# Altium PCB LST.PcbDoc (part 4 of 6)
Units mil, origin at the board's own origin, x right, y up, seen from the top; angles counter-clockwise.
Board outline 4330.71 x 4330.71 mil, 2 copper layers (Top Layer, Bottom Layer), stack 50 mil thick; 464 components, 242 nets, 1328 pads, 128 vias.
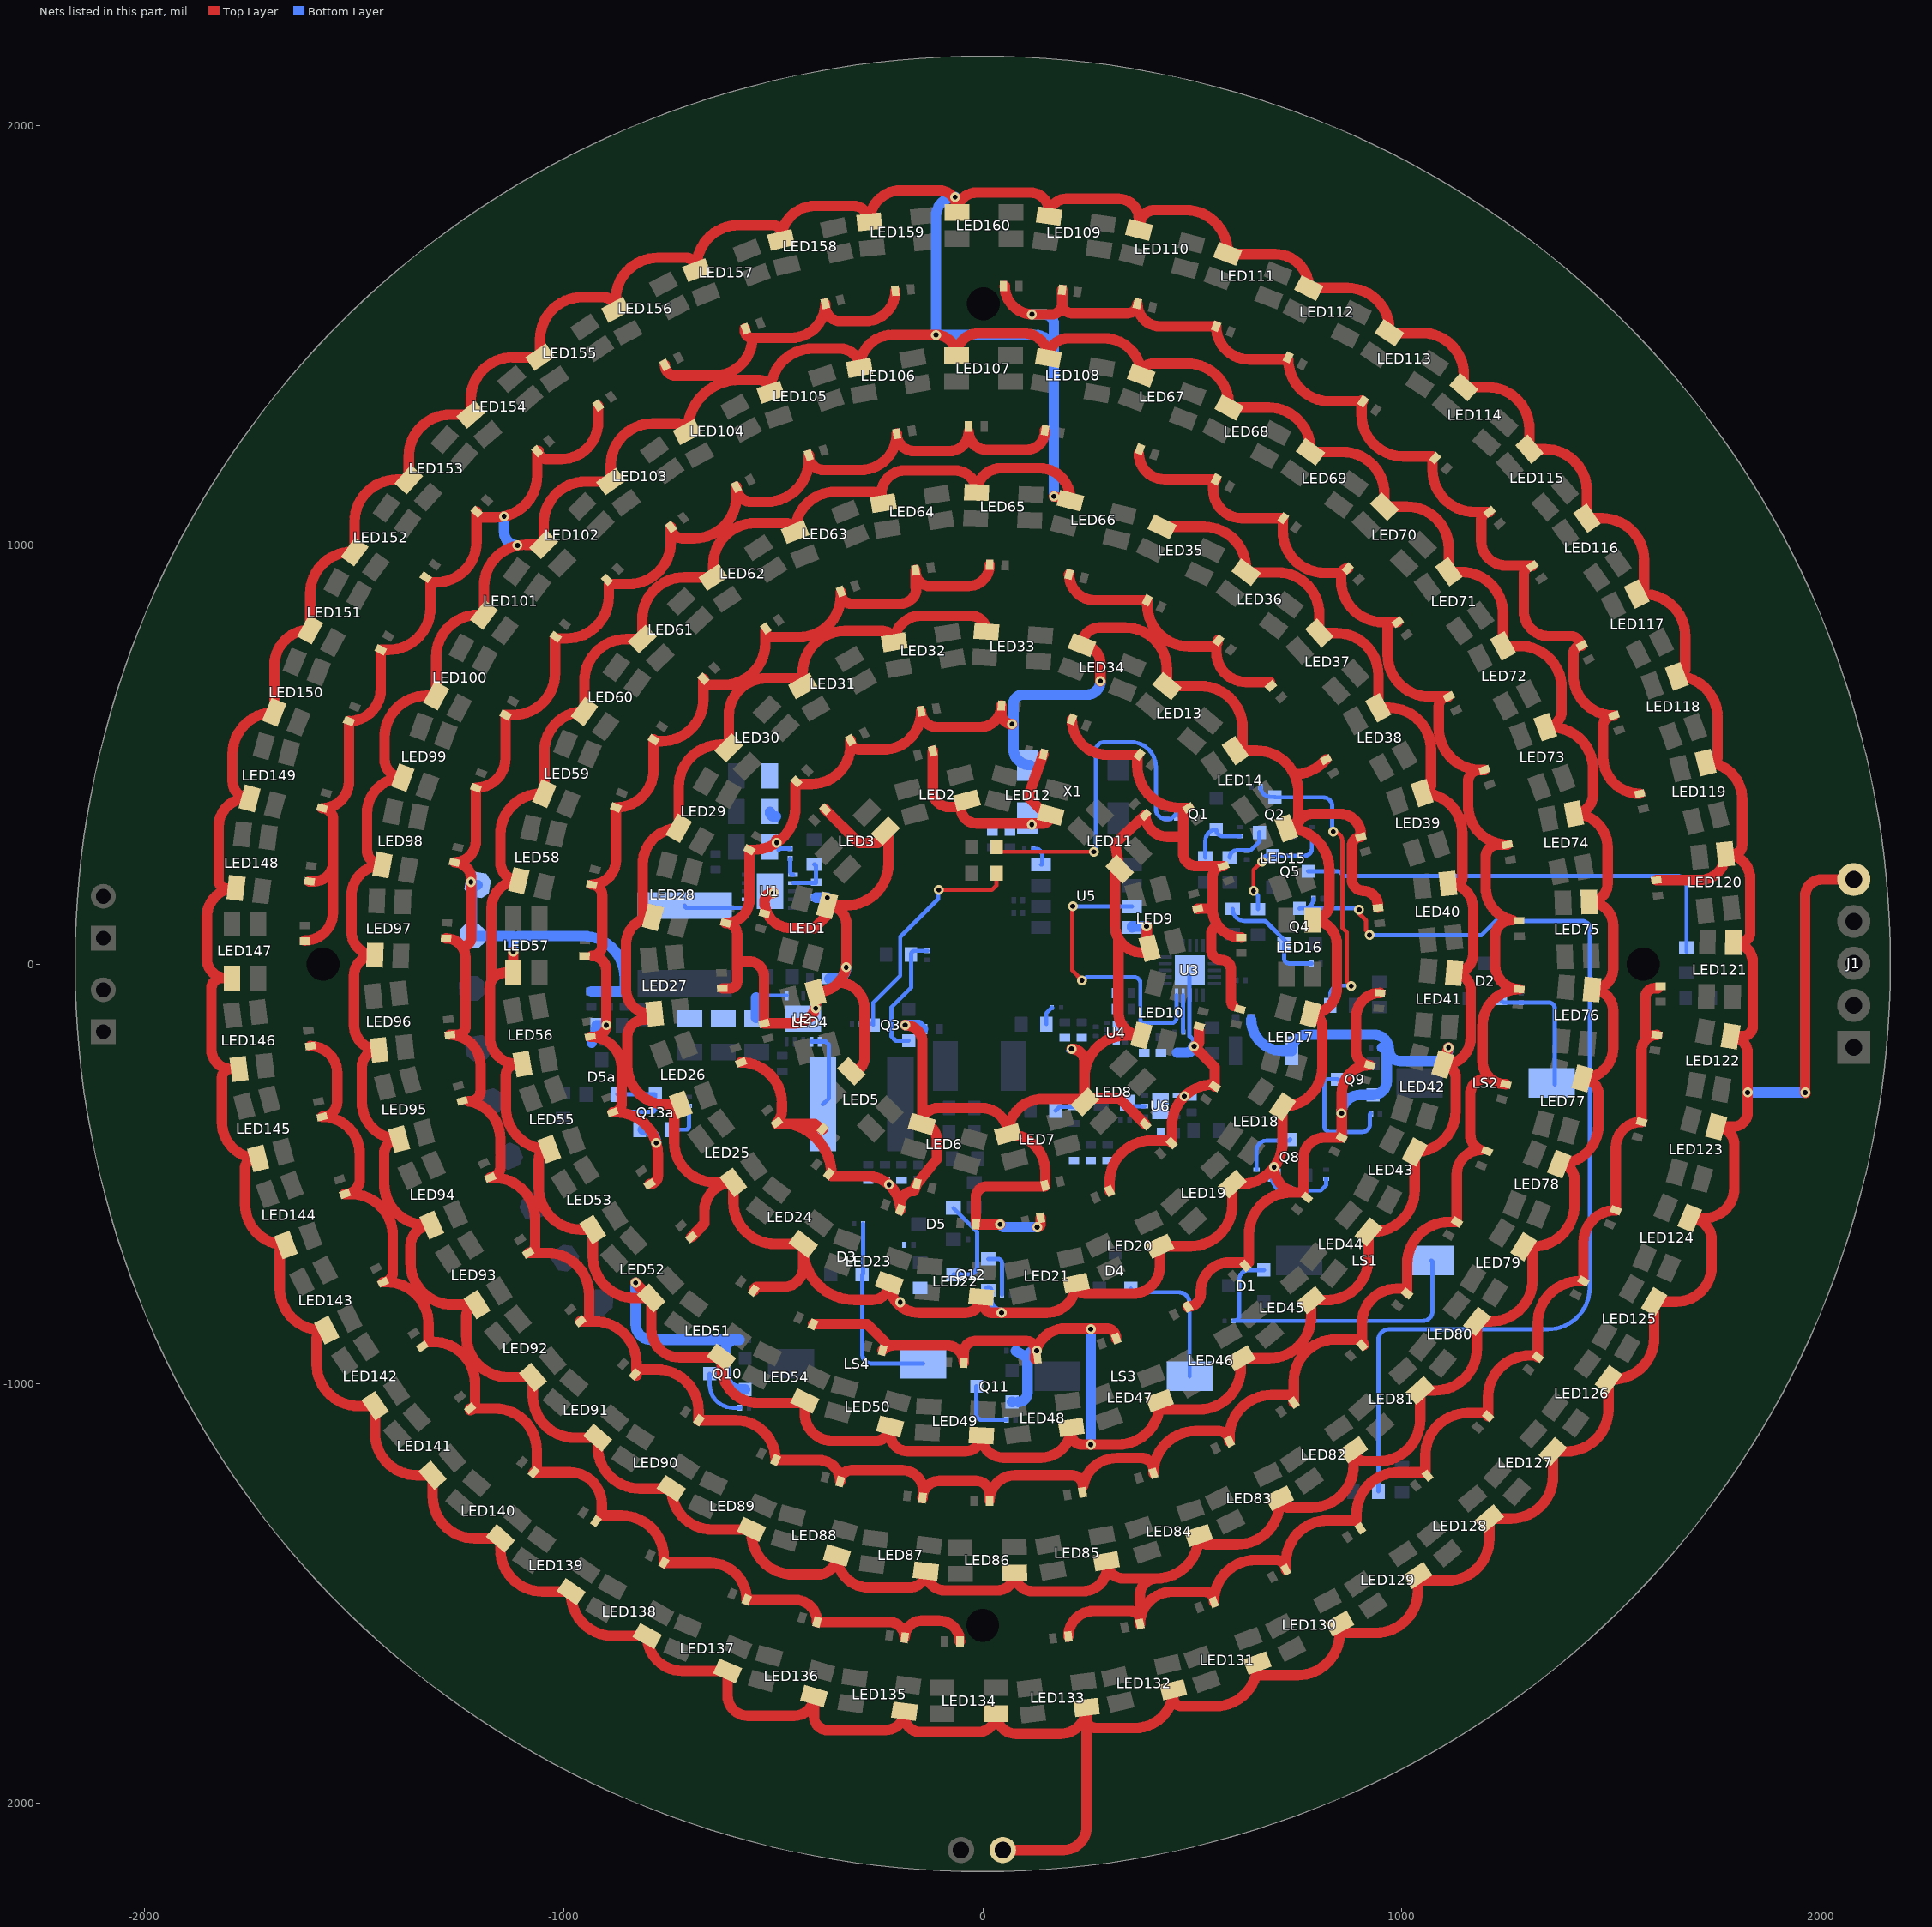
[diagram p3: the nets of this part, all layers, seen from the top]

## Via types
v1: diameter 23.62, hole 11.81, Top Layer to Bottom Layer, tented top, 98 vias
v2: diameter 23.62, hole 11.81, Top Layer to Bottom Layer, 30 vias

## Nets (pads, with @x,y where several pads share a name; then routed paths per layer and width w, separated by ;. In a path a pad name is that pad's centre, name@x,y a point inside that pad or via, vN(x,y) a via of type N, cw(c..) or ccw(c..) an arc to the next point about the centre after c; other vN are vias at no path point) (continued)
GND: C1.1 C2.1 C3.1 C4.1 C5.1 C6.1 C7.2 C8.2 C9.1 C10.1 C11.1 C12.1 C13.1 C14.2 C15.2 C16.2 C17.2 C18.2 C19.2 C20.2 C21.2 C22.2 C23.2 C24.2 C25.1 C26.1 C27.1 C28.1 C29.1 C30.1 C31.1 C32.1 C33.1 C34.1 C35.1 C36.1 C37.1 C38.1 C39.1 C40.1 C41.1 C42.1 C43.1 C44.1 C45.1 C46.1 C47.1 C48.1 C49.1 C50.1 C51.1 C52.1 C53.1 C54.1 C55.1 C56.1 C57.1 C58.1 C59.1 C60.1 C61.1 C62.1 C63.1 C64.1 C65.1 C66.1 C67.1 C68.1 C69.1 C70.1 C71.1 C72.1 C73.1 C74.1 C75.1 C76.1 C77.1 C78.1 C79.1 C80.1 C81.1 C82.1 C83.1 C84.1 C85.1 C86.1 C87.1 C88.1 C89.1 C90.1 C91.1 C92.1 C93.1 C94.1 C95.1 C96.1 C97.1 C98.1 C99.1 C100.1 C101.1 C102.1 C103.1 C104.1 C105.1 C106.1 C107.1 C108.1 C109.1 C110.1 C111.1 C112.1 C113.1 C114.1 C115.1 C116.1 C117.1 C118.1 C119.1 C120.1 C121.1 C122.1 C123.1 C124.1 C125.1 C126.1 C127.1 C128.1 C129.1 C130.1 C131.1 C132.1 C133.1 C134.1 C135.1 C136.1 C137.1 C138.1 C139.1 C140.1 C141.1 C142.1 C143.1 C144.1 C145.1 C146.1 C147.1 C148.1 C149.1 C150.1 C151.1 C152.1 C153.1 C154.1 C155.1 C156.1 C157.1 C158.1 C159.1 C160.1 C161.1 C162.1 C163.1 C164.1 C165.1 C166.1 C167.1 C168.1 C169.1 C170.1 C171.1 C172.1 C173.1 C174.1 C175.1 C176.1 C177.1 C178.1 C179.1 C180.1 C181.1 C182.1 C183.1 C184.1 C185.1 C186.1 C187.1 C188.1 C189.1 C191.1 C192a.1 J1.5 J2.2 LED1.3 LED2.3 LED3.3 LED4.3 LED5.3 LED6.3 LED7.3 LED8.3 LED9.3 LED10.3 LED11.3 LED12.3 LED13.3 LED14.3 LED15.3 LED16.3 LED17.3 LED18.3 LED19.3 LED20.3 LED21.3 LED22.3 LED23.3 LED24.3 LED25.3 LED26.3 LED27.3 LED28.3 LED29.3 LED30.3 LED31.3 LED32.3 LED33.3 LED34.3 LED35.3 LED36.3 LED37.3 LED38.3 LED39.3 LED40.3 LED41.3 LED42.3 LED43.3 LED44.3 LED45.3 LED46.3 LED47.3 LED48.3 LED49.3 LED50.3 LED51.3 LED52.3 LED53.3 LED54.3 LED55.3 LED56.3 LED57.3 LED58.3 LED59.3 LED60.3 LED61.3 LED62.3 LED63.3 LED64.3 LED65.3 LED66.3 LED67.3 LED68.3 LED69.3 LED70.3 LED71.3 LED72.3 LED73.3 LED74.3 LED75.3 LED76.3 LED77.3 LED78.3 LED79.3 LED80.3 LED81.3 LED82.3 LED83.3 LED84.3 LED85.3 LED86.3 LED87.3 LED88.3 LED89.3 LED90.3 LED91.3 LED92.3 LED93.3 LED94.3 LED95.3 LED96.3 LED97.3 LED98.3 LED99.3 LED100.3 LED101.3 LED102.3 LED103.3 LED104.3 LED105.3 LED106.3 LED107.3 LED108.3 LED109.3 LED110.3 LED111.3 LED112.3 LED113.3 LED114.3 LED115.3 LED116.3 LED117.3 LED118.3 LED119.3 LED120.3 LED121.3 LED122.3 LED123.3 LED124.3 LED125.3 LED126.3 LED127.3 LED128.3 LED129.3 LED130.3 LED131.3 LED132.3 LED133.3 LED134.3 LED135.3 LED136.3 LED137.3 LED138.3 LED139.3 LED140.3 LED141.3 LED142.3 LED143.3 LED144.3 LED145.3 LED146.3 LED147.3 LED148.3 LED149.3 LED150.3 LED151.3 LED152.3 LED153.3 LED154.3 LED155.3 LED156.3 LED157.3 LED158.3 LED159.3 LED160.3 P7.1 P9.1 Q8.2 Q9.2 Q10.2 Q11.2 Q12.2 Q13a.2 R14.2 R16.2 R24.2 R25.2 R26.2 R27.2 R34.1 R35a.1 SW1.2 U1.11 U2.11 U3.3 U3.21 U4.5 U4.9 U5.4 U6.1 U6.7 X1.2 X1.3 | length 83669.4
  Top Layer w10: C85.1@-936,-172.61 C85.1@-925.61,-172.61
  Top Layer w25: -1803,180.39 cw(c-1803,200.39) -1823,200.39 -1823,328.39 cw(c-1755.32,328.39) -1755.32,396.07 LED149.3@-1748.75,396.07 cw(c-1748.75,437.06) -1789.74,437.06 -1789.74,501.46 cw(c-1690.02,501.46) LED150.3@-1690.02,601.18 -1690.02,712.48 cw(c-1604.51,712.48) LED151.3@-1604.51,798 -1604.51,883.95 cw(c-1504.51,883.95) -1504.51,983.95 LED152.3@-1498.32,983.95 -1498.32,1056.22 cw(c-1398.32,1056.22) -1398.32,1156.22 LED153.3@-1369.32,1156.22 -1369.32,1211.5 cw(c-1269.32,1211.5) -1269.32,1311.5 LED154.3@-1221.13,1311.5 -1221.13,1348.07 cw(c-1121.13,1348.07) -1121.13,1448.07 LED155.3@-1055.92,1448.07 -1055.92,1491.39 cw(c-955.92,1491.39) -955.92,1591.39 -905.46,1591.39 cw(c-905.46,1561.54) LED156.3@-875.61,1561.54 -875.61,1585.39 cw(c-775.61,1585.39) -775.61,1685.39 -708.1,1685.39 cw(c-708.1,1659.71) LED157.3@-682.42,1659.71 ; LED147.3@-1791.1,-32.67 LED147.3@-1805.06,-32.67 ; LED148.3@-1781.74,182.09 ccw(c-1781.74,112.83) -1851,112.83 -1851,13.28 ccw(c-1805.06,13.28) LED147.3@-1805.06,-32.67 ; C177.1@-1617,56.87 ccw(c-1617,123.87) -1550,123.87 -1550,242.39 ; C178.1@-1606.25,198.03 -1594.36,198.03 ccw(c-1594.36,242.39) -1550,242.39 ; C176.1@-1604,-194.97 cw(c-1604,-258.97) -1540,-258.97 -1540,-327.8 cw(c-1575.84,-327.8) C175.1@-1575.84,-363.64 cw(c-1575.84,-453.47) -1486,-453.47 -1486,-512.32 cw(c-1521.67,-512.32) C174.1@-1521.67,-547.99 -1507.21,-547.99 cw(c-1507.21,-647.99) -1407.21,-647.99 -1407.21,-734.7 cw(c-1430.6,-734.7) C173.1@-1430.6,-758.09 -1422.03,-758.09 cw(c-1422.03,-858.09) -1322.03,-858.09 -1322.03,-900.58 -1311,-900.58 cw(c-1311,-1000.58) -1211,-1000.58 -1211,-1051.26 cw(c-1222.86,-1051.26) C171.1@-1214.38,-1059.56 ; LED143.3@-1565.4,-872.58 LED143.3@-1569.97,-872.58 ; C126.1@-1279.97,61.91 cw(c-1279.97,15.95) -1242.29,42.28 ; C171.1@-1222.86,-1063.13 ccw(c-1222.86,-1051.26) C171.1@-1214.38,-1059.56 ; C171.1@-1222.86,-1059.56 C171.1@-1214.38,-1059.56 ; C183.1@-1207.38,1079.64 -1207.38,1008.56 cw(c-1305,1008.56) -1305,910.94 -1317.59,910.94 -1317.59,850.21 cw(c-1417.59,850.21) -1417.59,750.21 C181.1@-1435.97,750.21 -1435.97,656.2 cw(c-1511.93,656.2) C180.1@-1511.93,580.24 -1511.93,436.38 cw(c-1575.79,436.38) C179.1@-1575.79,372.52 cw(c-1575.79,346.73) -1550,346.73 -1550,242.39 ; -1198.18,1066.39 -1162.96,1066.39 ccw(c-1162.96,1166.39) v1@-1142,1068.61 ; -1172,-35.61 -1172,134.3 cw(c-1106.83,134.3) LED58.3@-1106.83,199.47 cw(c-1106.83,243.19) -1150.54,243.19 -1150.54,310.27 cw(c-1053.7,310.27) -1053.7,407.11 LED59.3@-1045.86,407.11 -1045.86,507.69 cw(c-950.11,507.69) LED60.3@-950.11,603.44 -950.11,675.91 cw(c-850.11,675.91) -850.11,775.91 LED61.3@-812.05,775.91 -812.05,823.31 cw(c-712.05,823.31) -712.05,923.31 LED62.3@-643.09,923.31 -643.09,952.39 cw(c-543.09,952.39) -543.09,1052.39 -468.87,1052.39 cw(c-468.87,1031.04) LED63.3@-447.52,1031.04 cw(c-351.17,1031.04) -351.17,1127.39 -264.34,1127.39 cw(c-264.34,1100.01) LED64.3@-236.95,1100.01 ; v1@-1142,1068.65 v1(-1141.84,1068.65) ccw(c-1162.96,1166.39) -1062.96,1166.39 C184.1@-1062.96,1224.25 ; v1(-1120,30.39) LED57.3@-1120.1,-20.18 -1140.57,-20.18 ccw(c-1140.57,-55.61) -1176,-55.61 -1176,-172.61 ccw(c-1111,-172.61) -1111,-237.61 ccw(c-1111,-264.61) -1138,-264.61 -1138,-340.92 ccw(c-1038,-340.92) -1038,-440.92 LED55.3@-1034.14,-440.92 ccw(c-1034.14,-465.94) -1059.16,-465.94 -1059.16,-532.85 ccw(c-959.16,-532.85) -959.16,-632.85 LED53.3@-930.3,-632.85 -930.3,-696.04 ccw(c-830.3,-696.04) -830.3,-796.04 LED52.3@-794.24,-796.04 ; C170.1@-1071.04,-1211.75 C170.1@-1067.47,-1211.75 ; C184.1@-1060.18,1225.25 ccw(c-1040.32,1225.25) -1040.32,1205.39 -1006,1205.39 ccw(c-1006,1293.78) -917.61,1293.78 C185.1@-917.61,1333.04 ; LED102.3@-1054.62,1001.08 -1089.7,1001.08 ccw(c-1089.7,901.08) -1189.7,901.08 LED101.3@-1189.7,833.54 -1203.77,833.54 ccw(c-1203.77,733.54) -1303.77,733.54 LED100.3@-1303.77,640.98 -1327,640.98 ccw(c-1327,540.98) -1427,540.98 -1427,489.04 ccw(c-1383.31,489.04) LED99.3@-1383.31,445.35 ccw(c-1383.31,359.66) -1469,359.66 -1469,274.09 ccw(c-1431.85,274.09) LED98.3@-1431.85,236.94 ccw(c-1431.85,162.79) -1506,162.79 -1506,78.13 ccw(c-1449.98,78.13) LED97.3@-1449.98,22.12 ccw(c-1449.98,-27.9) -1500,-27.9 -1500,-144.26 ccw(c-1440.18,-144.26) LED96.3@-1440.18,-204.07 ccw(c-1440.18,-244.89) -1481,-244.89 -1481,-328.36 ccw(c-1392.33,-328.36) LED95.3@-1392.33,-417.03 ccw(c-1392.33,-452.7) -1428,-452.7 -1428,-521.88 ccw(c-1328,-521.88) -1328,-621.88 LED94.3@-1314.3,-621.88 ccw(c-1314.3,-672.58) -1365,-672.58 -1365,-711.85 ccw(c-1265,-711.85) -1265,-811.85 LED93.3@-1206.16,-811.85 ccw(c-1206.16,-837.69) -1232,-837.69 -1232,-884.96 ccw(c-1132,-884.96) -1132,-984.96 LED92.3@-1073.32,-984.96 -1073.32,-1029.33 ccw(c-973.32,-1029.33) -973.32,-1129.33 LED91.3@-918.54,-1129.33 -918.54,-1150.44 ccw(c-818.54,-1150.44) -818.54,-1250.44 LED90.3@-742.79,-1250.44 ccw(c-645.14,-1250.44) -645.14,-1348.09 LED89.3@-551.63,-1348.09 -551.63,-1355.61 ccw(c-451.63,-1355.61) -451.63,-1455.61 -393.85,-1455.61 ccw(c-393.85,-1409.93) LED88.3@-348.18,-1409.93 ccw(c-271.5,-1409.93) -271.5,-1486.61 -174.96,-1486.61 ccw(c-174.96,-1447.35) LED87.3@-135.7,-1447.35 ccw(c-89.44,-1447.35) -89.44,-1493.61 34.07,-1493.61 ccw(c34.07,-1451.58) LED86.3@76.1,-1451.58 ccw(c120.13,-1451.58) 120.13,-1495.61 238.07,-1495.61 ccw(c238.07,-1436.58) 297.1,-1436.58 ccw(c336,-1423.61) 336,-1464.61 415.02,-1464.61 ; LED102.3@-1047.31,1001.08 -1047.31,1051.6 cw(c-947.31,1051.6) -947.31,1151.6 LED103.3@-887.52,1151.6 -887.52,1190.3 cw(c-787.52,1190.3) -787.52,1290.3 -725.37,1290.3 cw(c-725.37,1269.54) LED104.3@-704.61,1269.54 cw(c-579.76,1269.54) -579.76,1394.39 -535.41,1394.39 cw(c-535.41,1364.79) LED105.3@-505.81,1364.79 -505.81,1368.71 cw(c-405.81,1368.71) -405.81,1468.71 -339.89,1468.71 cw(c-339.89,1422.81) LED106.3@-293.99,1422.81 cw(c-215.4,1422.81) -215.4,1501.39 v1(-111.46,1501.39) cw(c-111.46,1452.49) LED107.3@-62.57,1452.49 cw(c-9.67,1452.49) -9.67,1505.39 97.66,1505.39 cw(c97.66,1446.23) LED108.3@156.81,1446.23 cw(c203.97,1446.23) 203.97,1493.39 289.27,1493.39 cw(c289.27,1404.7) LED67.3@377.96,1404.7 cw(c406.65,1404.7) 406.65,1433.39 487.59,1433.39 cw(c487.59,1333.39) 587.59,1333.39 LED68.3@587.59,1328.16 682.05,1328.16 cw(c682.05,1228.16) 782.05,1228.16 LED69.3@782.05,1222.5 858.34,1222.5 cw(c858.34,1122.5) 958.34,1122.5 LED70.3@958.34,1099.35 ; C130.1@-1020.13,775.95 -1020.13,695.06 cw(c-1120.13,695.06) -1120.13,595.06 C129.1@-1138.69,595.06 -1138.69,491.7 cw(c-1209,491.7) C128.1@-1209,421.39 -1209,294.53 cw(c-1260.16,294.53) C127.1@-1260.16,243.36 cw(c-1260.16,203.2) -1220,203.2 -1220,64.57 cw(c-1242.29,64.57) -1242.29,42.28 ; C130.1@-1020.13,777.61 -992.16,777.61 ccw(c-992.16,877.61) -892.16,877.61 -892.16,907.39 -843.97,907.39 ccw(c-843.97,1007.39) -743.97,1007.39 C132.1@-743.97,1043.52 ccw(c-716.84,1043.52) -716.84,1016.39 -687.48,1016.39 ccw(c-687.48,1116.39) -587.48,1116.39 C133.1@-587.48,1138.99 ccw(c-551.88,1138.99) -551.88,1103.39 -514.93,1103.39 ccw(c-514.93,1203.39) -414.93,1203.39 C134.1@-414.93,1214.27 ; C121.1@-960,-851.61 -926.04,-851.61 cw(c-926.04,-951.61) -826.04,-951.61 C120.1@-826.04,-980.75 ; -939,-838.61 -939,-788.2 ccw(c-1039,-788.2) -1039,-688.2 C122.1@-1084.2,-688.2 ccw(c-1084.2,-672) -1068,-672 -1068,-608.62 ccw(c-1168,-608.62) -1168,-508.62 -1174.65,-508.62 ccw(c-1174.65,-484.97) -1151,-484.97 -1151,-415.83 ccw(c-1241.35,-415.83) -1225.87,-326.82 -1223.21,-326.82 ccw(c-1223.21,-301.61) -1198,-301.61 -1198,-241.11 ccw(c-1271.07,-241.11) C125.1@-1271.07,-168.04 -1253.43,-168.04 ccw(c-1253.43,-148.61) -1234,-148.61 -1234,15.95 ccw(c-1279.97,15.95) -1242.29,42.28 ; C85.1@-936,-172.61 cw(c-936,-247.61) -861,-247.61 -861,-331.32 cw(c-882.67,-331.32) C84.1@-882.67,-352.99 -875,-352.99 cw(c-875,-452.99) -775,-452.99 -775,-504.32 cw(c-795,-504.32) C83.1@-795,-524.32 ; C85.1@-925.61,-172.61 ccw(c-925.61,-145) v2(-898,-145) -898,-14.49 ccw(c-932.44,-14.49) -932.44,19.95 ccw(c-932.44,44.39) -908,44.39 -908,165.39 ccw(c-933,165.39) C87.1@-933,190.39 ccw(c-933,248.16) -875.23,248.16 C88.1@-875.23,374.36 ccw(c-875.23,464.51) -785.08,464.51 C89.1@-785.08,532.36 ; v1(-828,-759.61) LED52.3@-794.24,-796.04 ; -818,-966.74 -777,-966.74 cw(c-777,-1066.26) -677.48,-1066.26 C119.1@-677.48,-1087.69 -588.98,-1087.69 cw(c-588.98,-1182.43) C118.1@-494.23,-1182.43 -391.5,-1182.43 cw(c-391.5,-1233.71) C117.1@-340.22,-1233.71 cw(c-313.12,-1233.71) -313.12,-1206.61 -192.71,-1206.61 cw(c-192.71,-1257.88) -141.44,-1257.88 ; C89.1@-785.08,536.27 C89.1@-785.08,532.36 ; C186.1@-758.33,1429.7 ccw(c-733.33,1429.7) -733.33,1404.7 -639.18,1404.7 ccw(c-639.18,1494.39) -549.49,1494.39 ; C82.1@-695,-650.61 -664,-617.85 -664,-588.91 cw(c-594.98,-588.91) LED25.3@-594.98,-519.89 ; LED157.3@-682.42,1656.29 LED157.3@-682.42,1659.71 ; C90.1@-666.31,681.37 C90.1@-666.31,670.16 ; LED51.3@-623.15,-937.31 LED51.3@-623.15,-937.61 ; C56.1@-621.03,-57.09 -602.19,-57.09 ccw(c-602.19,-40.61) -585.72,-40.61 -585.72,7.39 ; LED30.3@-605.65,516.73 LED30.3@-605.65,524.04 ; C55.1@-576.37,-233.88 cw(c-576.37,-331.25) -479,-331.25 -479,-348.74 cw(c-519.51,-348.74) C54.1@-490.87,-377.39 ; C187.1@-567.32,1516.76 -567.32,1512.22 ccw(c-549.49,1512.22) -549.49,1494.39 ; C58.1@-556.5,270.72 -556.5,154.89 cw(c-613,154.89) C57.1@-613,98.39 cw(c-613,71.11) -585.72,71.11 -585.72,7.39 ; C58.1@-556.5,273.35 -547.08,273.35 ccw(c-547.08,373.35) -447.08,373.35 -447.08,430.31 -408.42,430.31 ccw(c-408.42,523.24) -315.48,523.24 C60.1@-315.48,534.99 ccw(c-292.88,534.99) -292.88,512.39 -237.46,512.39 ccw(c-237.46,602.78) -170.79,541.75 ccw(c-237.46,602.78) -147.07,602.78 C61.1@-147.07,604.18 ccw(c-108.59,604.18) -108.59,565.7 -7.11,565.7 ccw(c-7.11,617.36) C62.1@44.55,617.36 44.55,598.62 ccw(c70,598.62) v1(70,573.17) ; C81.1@-545.78,-778.22 cw(c-537.16,-778.22) -537.16,-769.61 -476,-769.61 ccw(c-476,-721.88) -428.27,-721.88 LED24.3@-428.27,-677.96 ; v1(-499,170.39) -499,171.39 ccw(c-499,149.84) -520.55,149.84 ccw(c-457.1,149.84) -512.49,118.89 ccw(c-457.1,149.84) -457.1,86.39 -402,86.39 -371.25,117.14 LED1.3@-371.25,140.71 ; v1@-493,296.39 -493,291.66 ccw(c-491.53,291.66) v1(-491.53,290.19) ; C54.1@-490.87,-379.05 -490.87,-381 -457.74,-381 ; C134.1@-414.93,1214.67 ccw(c-379.64,1214.67) -379.64,1179.39 -292.01,1179.39 ccw(c-292.01,1266.18) C135.1@-205.22,1266.18 ccw(c-163.29,1266.18) -163.29,1224.25 -80,1224.25 ccw(c-80,1270.75) -33.5,1270.75 ccw(c9.75,1270.75) 9.75,1227.5 104,1227.5 ccw(c104,1272.07) 141.84,1248.53 ccw(c104,1272.07) 148.56,1272.07 C137.1@148.56,1273.96 ; C80.1@-405.23,-858.43 -275.57,-858.43 -226.17,-907.83 ; C34.1@-382.17,-394.06 -382.64,-393.73 -401,-381 -457.74,-381 ; C31.1@-375.92,369.72 -295.59,289.39 -250,289.39 LED3.3@-225.04,314.35 ; C92.1@-338.54,889.13 C92.1@-338.54,884.93 ; LED5.3@-313.66,-255.27 ccw(c-313.66,-223.61) -282,-223.61 -282,-105.54 ccw(c-344.3,-105.54) -344.3,-43.24 ; LED5.3@-313.66,-247.96 LED5.3@-313.66,-244.61 ; -242,1121.39 cw(c-185,1121.39) -185,1178.39 -67.11,1178.39 cw(c-67.11,1125.73) LED65.3@-14.44,1125.73 cw(c43.22,1125.73) 43.22,1183.39 136,1183.39 cw(c136,1110.51) 208.88,1110.51 LED66.3@208.88,1106.19 v1(170,1116.39) ; C79.1@-239.13,-920.79 cw(c-209.73,-950.19) -209.73,-908.61 -86.99,-908.61 cw(c-86.99,-950.55) C78.1@-45.05,-950.55 -45.05,-925.66 cw(c-18,-925.66) -18,-898.61 104,-898.61 cw(c104,-920.61) v1@126,-920.61 ; LED50.3@-232.8,-1102.36 LED50.3@-232.8,-1098.52 ; LED3.3@-225.04,318.05 LED3.3@-225.04,314.35 ; v2@-223.51,-525.61 v2(-223.51,-525.68) ; C189.1@-208.4,1606.46 cw(c-280.46,1606.46) -280.46,1534.39 -340,1534.39 cw(c-340,1569.99) -375.6,1569.99 C188.1@-375.6,1575.91 cw(c-457.12,1575.91) -457.12,1494.39 -549.49,1494.39 ; v2(-185,-144.61) cw(c-185,-185.67) -143.94,-185.67 LED6.3@-143.94,-370.91 ; C93.1@-160.31,940.5 C93.1@-160.31,936.7 ; C116.1@-143.64,-1272.87 cw(c-102.77,-1272.87) -102.77,-1232 -16.49,-1232 cw(c-16.49,-1265) 16.51,-1265 ; C30.1@-119.13,509.18 -119.13,413.52 ccw(c-81,413.52) -81,375.39 -53.2,375.39 ccw(c-13.7,375.39) -13.7,335.88 141.56,335.88 ccw(c141.56,356.64) LED12.3@162.32,356.64 150.75,356.64 108,399.39 C41.1@145,501.39 ; LED160.3@-61.57,1793.49 cw(c-13.67,1793.49) -13.67,1841.39 112.44,1841.39 cw(c112.44,1795.44) 158.39,1795.44 LED109.3@158.39,1785.18 cw(c199.6,1785.18) 199.6,1826.39 324,1826.39 cw(c324,1777.91) 372.48,1777.91 LED110.3@372.48,1752.19 ; LED160.3@-61.57,1803.96 ccw(c-104,1803.96) -104,1846.39 -195.15,1846.39 ccw(c-195.15,1771.07) LED159.3@-270.46,1771.07 ccw(c-308.78,1771.07) -308.78,1809.39 -399.69,1809.39 ccw(c-399.69,1728.17) LED158.3@-480.91,1728.17 -480.91,1744.3 ccw(c-500,1744.3) -500,1763.39 -582.42,1763.39 ccw(c-582.42,1663.39) -682.42,1663.39 LED157.3@-682.42,1659.71 ; C164.1@-54.5,-1615.61 ccw(c-104.5,-1615.61) -56.87,-1600.4 ccw(c-104.5,-1615.61) -104.5,-1565.61 -145.69,-1565.61 ccw(c-145.69,-1606.19) C165.1@-186.26,-1606.19 ccw(c-223.74,-1606.19) -223.74,-1568.71 C166.1@-395.22,-1568.71 ccw(c-448.09,-1568.71) -448.09,-1515.84 C167.1@-562.97,-1515.84 ccw(c-651.23,-1515.84) -651.23,-1427.58 C168.1@-760.82,-1427.58 -760.82,-1415.11 ccw(c-860.82,-1415.11) -860.82,-1315.11 -909,-1315.11 -909,-1287.61 ccw(c-984.86,-1287.61) -984.86,-1211.75 C170.1@-1067.47,-1211.75 ; LED22.3@-3.39,-793.22 cw(c-41.17,-793.22) -41.17,-831 -151.88,-831 cw(c-151.88,-759.92) LED23.3@-222.96,-759.92 cw(c-263.65,-759.92) -263.65,-800.61 -305.62,-800.61 cw(c-305.62,-677.96) LED24.3@-428.27,-677.96 ; 4,-813.99 ccw(c21.01,-813.99) 21.01,-831 v2(45,-831) 152.23,-831 ccw(c152.23,-760.61) LED21.3@222.62,-760.61 ccw(c247.62,-760.61) 247.62,-785.61 356.52,-785.61 ccw(c356.52,-719.47) 422.66,-719.47 LED20.3@422.66,-672.51 495.43,-672.51 ccw(c495.43,-572.51) 595.43,-572.51 LED19.3@595.43,-524.32 615,-524.32 ccw(c615,-424.32) v1@695,-484.32 ; LED33.3@8.76,793.92 ccw(c-28.98,793.92) -28.98,831.66 -147.13,831.66 ccw(c-147.13,767.81) LED32.3@-210.99,767.81 ccw(c-238.28,767.81) -238.28,795.1 -329.47,795.1 ccw(c-329.47,695.1) -429.47,695.1 LED31.3@-429.47,664.04 ccw(c-447.82,664.04) -447.82,682.39 -516,682.39 ccw(c-516,592.74) -605.65,592.74 LED30.3@-605.65,524.04 ; C115.1@16.5,-1279.61 cw(c77.37,-1279.61) 77.37,-1218.74 212.84,-1218.74 cw(c212.84,-1245.34) 239.44,-1245.34 cw(c320.01,-1259.4) 320.01,-1177.61 378.25,-1177.61 cw(c378.25,-1206.96) 407.59,-1206.96 C113.1@407.59,-1213.61 ; C94.1@16.51,953.04 cw(c-34.13,953.04) -34.13,902.39 -126,902.39 cw(c-126,936.7) C93.1@-160.31,936.7 ; v1(41.61,-620.22) C51.1@-16.57,-620.22 -16.57,-557.18 cw(c11,-557.18) 11,-529.61 146.92,-529.61 ccw(c146.92,-527.4) C36.1@149.13,-527.4 149.13,-493.91 ccw(c60.17,-493.91) LED7.3@60.17,-404.95 ; J2.2@48,-2112.61 192.88,-2112.61 ccw(c192.88,-2057.61) 247.88,-2057.61 247.88,-1809.48 ccw(c240.53,-1809.48) 240.53,-1802.14 ; C138.1@52.5,1618.39 ccw(c120.5,1618.39) v1@120.5,1550.39 ; v1(117.5,1550.39) v1@120.5,1550.39 ; C77.1@124.95,-940.61 cw(c196.95,-940.61) 196.95,-868.61 294.71,-868.61 cw(c294.71,-892.28) C76.1@318.38,-892.28 ; v1(130.16,-627.02) ccw(c130.16,-619.09) 138.1,-619.09 C50.1@138.1,-604.76 ; C139.1@189.68,1608.96 189.68,1575.71 ; C163.1@204.36,-1603.36 cw(c265.11,-1603.36) 265.11,-1542.61 353,-1542.61 cw(c353,-1564.64) C162.1@375.03,-1564.64 ; C95.1@206.1,930.34 ccw(c267.94,930.34) 267.94,868.5 C64.1@392.37,868.5 392.37,858.39 ccw(c492.37,858.39) 492.37,758.39 546.3,758.39 ccw(c546.3,772.66) C65.1@557.45,763.76 ; v1(212,-201.61) cw(c212,-232.61) 243,-232.61 243,-269.36 ; C63.1@212.85,584.32 ccw(c296.89,584.32) 296.89,500.28 C42.1@368.83,500.28 ; LED8.3@244.35,-328.27 253.01,-319.61 325.84,-319.61 C37.1@387.92,-381.69 ; v1(281,675.39) 281,717.2 ccw(c236.79,717.2) LED34.3@236.79,761.41 cw(c278.76,761.41) 278.76,803.39 339.53,803.39 cw(c339.53,703.39) 439.53,703.39 LED13.3@439.53,663.72 520,663.72 cw(c520,563.72) 620,563.72 620,527.68 cw(c602.44,527.68) LED14.3@602.44,510.12 653,510.12 cw(c653,410.12) 743.1,453.51 ; C49.1@302.77,-540.79 302.77,-520.06 cw(c402.77,-520.06) 402.77,-420.06 C48.1@449.95,-420.06 ; LED11.3@315.66,223.74 315.66,92.97 ccw(c380.82,92.97) 323.74,61.55 ; LED11.3@326.66,226.74 316,288.39 C40.1@388,356.64 ccw(c440.25,356.64) 440.25,304.39 478.04,304.39 ; C42.1@370.74,500.28 C42.1@368.83,500.28 ; C96.1@372.37,1218.52 ccw(c433.81,1218.52) 433.81,1157.07 C97.1@556.67,1157.07 ccw(c556.67,1150.41) 550,1150.41 550,1132.39 ccw(c618.13,1132.39) 618.13,1064.26 C98.1@715.84,1064.26 ; LED110.3@375.5,1764.65 cw(c410.24,1764.65) 410.24,1799.39 483.87,1799.39 cw(c483.87,1699.39) 543.87,1779.39 cw(c483.87,1699.39) 583.87,1699.39 LED111.3@583.87,1694.56 697.06,1694.56 cw(c697.06,1613.44) LED112.3@778.18,1613.44 870.37,1613.44 cw(c870.37,1513.44) 970.37,1513.44 LED113.3@970.37,1506.28 1047.83,1506.28 cw(c1047.83,1406.28) 1147.83,1406.28 LED114.3@1147.83,1376.71 1204.11,1376.71 cw(c1204.11,1276.71) 1304.11,1276.71 LED115.3@1304.11,1229.05 1341.44,1229.05 cw(c1341.44,1129.05) 1441.44,1129.05 LED116.3@1441.44,1064.12 1478,1064.12 cw(c1478,964.12) 1578,964.12 1578,901.07 cw(c1560.37,901.07) LED117.3@1560.37,883.45 1576,883.45 cw(c1576,783.45) 1676,783.45 1676,705.39 cw(c1657.66,705.39) 1657.66,687.05 LED118.3@1655.83,687.05 cw(c1655.83,589.88) 1753,589.88 1753,494.39 cw(c1740.17,494.39) 1740.17,481.56 LED119.3@1724.56,481.56 cw(c1724.56,394.12) 1812,394.12 1812,284.39 cw(c1790.46,284.39) 1790.46,262.85 LED120.3@1772.18,262.85 ; LED9.3@380.82,27.82 cw(c380.82,92.97) 323.74,61.55 ; LED9.3@391.25,36.04 v1@391.25,90.64 ; C113.1@407.59,-1213.89 C113.1@407.59,-1213.61 ; LED47.3@422.31,-1040.75 LED47.3@422.31,-1043.5 ; LED35.3@427.6,1043.65 528.15,1043.65 cw(c528.15,943.65) 628.15,943.65 LED36.3@628.15,935.09 702.91,935.09 cw(c702.91,835.09) 802.91,835.09 LED37.3@802.91,790.18 843.9,790.18 cw(c843.9,690.18) 943.9,690.18 LED38.3@943.9,611.94 969.55,611.94 cw(c969.55,511.94) 1069.55,511.94 1069.55,429.33 cw(c1048.63,429.33) LED39.3@1048.63,408.41 cw(c1048.63,313.04) 1144,313.04 1144,206.39 cw(c1130.46,206.39) 1130.46,192.85 LED40.3@1110.18,192.85 cw(c1110.18,133.04) 1170,133.04 1170,24.39 cw(c1124.61,24.39) LED41.3@1124.61,-21 cw(c1124.61,-60.39) 1164,-60.39 1164,-175.61 cw(c1100.65,-175.61) 1100.65,-238.96 LED42.3@1097.62,-238.96 ; C48.1@451,-426.61 451,-386.46 cw(c551,-386.46) 482.23,-313.86 cw(c551,-386.46) C47.1@551,-286.46 ; C75.1@489,-816.61 ccw(c489,-785.61) 520,-785.61 520,-779.61 cw(c588.89,-779.61) 588.89,-710.72 632.17,-710.72 ; C39.1@513,132.39 513,132.89 548,132.89 ; C38.1@516.21,-156.61 516.21,-183.57 cw(c504.17,-183.57) v1(504.17,-195.61) 553.61,-245.05 C47.1@553.61,-291.46 ; C161.1@551.38,-1521.28 C161.1@551.38,-1520.61 ; C65.1@560.56,772.66 cw(c546.3,772.66) C65.1@557.45,763.76 ; 597.84,-99.47 cw(c614,-84.76) 592.15,-84.76 592.15,-11.76 ccw(c570,-11.76) 570,10.39 cw(c570,35.39) 545,35.39 545,72.21 cw(c562.88,72.21) 562.88,90.09 ; C45.1@617,63.89 cw(c617,132.89) 562.88,90.09 ; 635.26,-710.72 635.26,-644.46 cw(c735.26,-644.46) 735.26,-544.46 755.85,-544.46 ; LED131.3@655.18,-1685.1 ccw(c665.69,-1685.1) 665.69,-1695.61 751.61,-1695.61 ccw(c751.61,-1595.61) 851.61,-1595.61 LED130.3@851.61,-1572.76 ccw(c873.46,-1572.76) 873.46,-1594.61 938.13,-1594.61 ccw(c938.13,-1494.61) 1038.13,-1494.61 LED129.3@1038.13,-1470.17 ; LED131.3@655.18,-1669.61 cw(c555.18,-1669.61) 555.18,-1769.61 474,-1769.61 cw(c474,-1750.35) 454.74,-1750.35 LED132.3@454.74,-1730.83 cw(c363.96,-1730.83) 363.96,-1821.61 269,-1821.61 cw(c269,-1800.49) 247.88,-1800.49 LED133.3@247.88,-1772.61 cw(c184.88,-1772.61) 240.53,-1802.14 ; C66.1@685.23,667.87 685.23,673.39 628.36,673.39 cw(c628.36,744.3) 557.45,744.3 C65.1@557.45,763.76 ; v1(695,-483.61) ccw(c755.85,-483.61) v1@695,-484.32 ; C98.1@717.03,1064.26 C98.1@715.84,1064.26 ; LED15.3@724.14,324.7 ccw(c724.14,353.56) 753,353.56 753,410.12 ccw(c653,410.12) 743.1,453.51 ; C111.1@742.15,-1045.6 C111.1@742.15,-1035.84 ; C67.1@819.03,488.57 812.87,482.41 cw(c743.1,552.19) 743.1,453.51 ; C99.1@870.92,944.21 ccw(c870.92,928.29) 855,928.29 ; C143.1@903.66,1344.73 C143.1@903.66,1342.73 ; C143.1@907.08,1342.73 C143.1@903.66,1342.73 ; C110.1@909.06,-908.61 ccw(c895.06,-908.61) C110.1@905,-898.76 ; C69.1@943.07,134.79 943.07,139.68 ccw(c907.36,139.68) 907.36,175.39 cw(c907.36,201.75) 881,201.75 881,282.7 cw(c902.28,282.7) C68.1@902.28,303.98 902.28,308.8 ccw(c851.93,308.8) 851.93,359.15 786.83,359.15 ccw(c786.83,322.08) 749.76,322.08 cw(c727,224.7) 827,224.7 827,145.39 cw(c787,145.39) LED16.3@787,105.39 cw(c787,47.39) 845,47.39 845,-55.61 cw(c782,-55.61) LED17.3@782,-118.61 cw(c782,-146.61) 810,-146.61 810,-244.61 cw(c715,-244.61) LED18.3@715,-339.61 715,-424.32 cw(c615,-424.32) v1@695,-484.32 ; C70.1@948.22,-67.89 ccw(c948.22,-125.11) 891,-125.11 891,-207.41 ccw(c923.82,-207.41) C71.1@923.82,-240.23 ccw(c923.82,-307.36) 856.69,-307.36 C72.1@856.69,-413.28 814.75,-413.28 ccw(c814.75,-463.03) 765,-463.03 765,-544.46 755.85,-544.46 ; LED70.3@958.34,1092.04 1011.82,1092.04 cw(c1011.82,992.04) 1111.82,992.04 LED71.3@1111.82,936.13 1141.38,936.13 cw(c1141.38,836.13) 1241.38,836.13 LED72.3@1241.38,759.41 1281,759.41 cw(c1281,659.41) 1381,659.41 1381,604.56 cw(c1342.14,604.56) LED73.3@1342.14,565.7 1356,565.7 cw(c1356,465.7) 1456,465.7 1456,404.79 cw(c1410.36,404.79) LED74.3@1410.36,359.15 cw(c1410.36,278.51) 1491,278.51 1491,193.17 cw(c1446.83,193.17) LED75.3@1446.83,149 cw(c1446.83,91.83) 1504,91.83 1504,-9.61 cw(c1453.61,-9.61) LED76.3@1453.61,-60 cw(c1453.61,-110.39) 1504,-110.39 1504,-199.05 cw(c1430.75,-199.05) LED77.3@1430.75,-272.29 cw(c1430.75,-310.54) 1469,-310.54 1469,-382.42 cw(c1375.02,-382.42) LED78.3@1375.02,-476.4 cw(c1375.02,-513.37) 1412,-513.37 1412,-573.34 cw(c1312,-573.34) 1312,-673.34 1312,-751.61 cw(c1212,-751.61) 1212,-851.61 LED80.3@1179,-851.61 1179,-916.52 cw(c1079,-916.52) 1079,-1016.52 LED81.3@1043.79,-1016.52 1043.79,-1085.61 cw(c943.79,-1085.61) 943.79,-1185.61 912.29,-1185.61 cw(c912.29,-1158.05) LED82.3@884.73,-1158.05 884.73,-1195.61 cw(c784.73,-1195.61) 784.73,-1295.61 730.02,-1295.61 cw(c730.02,-1273.26) LED83.3@707.67,-1273.26 707.67,-1283.61 cw(c607.67,-1283.61) 607.67,-1383.61 536.39,-1383.61 cw(c536.39,-1362.24) LED84.3@515.02,-1362.24 515.02,-1364.61 cw(c415.02,-1364.61) 415.02,-1464.61 ; C100.1@990.13,816.28 974.41,816.28 ; C100.1@990.13,817.48 980.09,817.48 ccw(c980.09,803.39) 974.41,816.28 ; LED129.3@1038.13,-1457.61 LED129.3@1038.13,-1470.17 ; v1(1111.31,-198.61) LED42.3@1097.62,-238.96 ; C102.1@1196.67,463.77 C102.1@1188,463.77 ; C157.1@1205.38,-1077.86 C157.1@1205.38,-1073.81 ; C106.1@1247.79,-286.06 cw(c1247.79,-230.27) 1211.89,-272.98 ; C146.1@1308.51,951.28 1248.11,951.28 cw(c1248.11,1010.39) 1189,1010.39 1189,1059.36 cw(c1208.86,1059.36) C145.1@1208.86,1079.23 1173.25,1079.23 cw(c1173.25,1179.23) 1073.25,1179.23 1073.25,1211.77 1003.66,1211.77 cw(c1003.66,1311.77) 903.66,1311.77 C143.1@903.66,1342.73 ; C146.1@1311.39,950.54 ccw(c1311.39,929.75) 1290.59,929.75 1290.59,842.98 ccw(c1351,842.98) 1351,782.57 1403.02,782.57 cw(c1403.02,760.36) C147.1@1425.24,760.36 ; C156.1@1320.13,-932.84 1305.38,-932.84 ccw(c1305.38,-1032.84) 1205.38,-1032.84 C157.1@1205.38,-1073.81 ; C156.1@1324.13,-937.19 1324.13,-855.59 cw(c1424.13,-855.59) 1424.13,-755.59 C155.1@1433.25,-755.59 1433.25,-663.56 cw(c1510.23,-663.56) C154.1@1510.23,-586.58 1510.23,-437.3 cw(c1571.79,-437.3) C153.1@1571.79,-375.74 1571.79,-205.08 cw(c1608.57,-205.08) C152.1@1608.57,-168.29 ; C147.1@1429.2,760.36 ccw(c1429.2,740.15) 1409,740.15 1409,690.45 ccw(c1505.67,690.45) C148.1@1505.67,593.77 ccw(c1505.67,568.1) 1480,568.1 1480,494.66 ccw(c1567.52,494.66) C149.1@1567.52,407.14 ; 1581,-169.61 1581,-78.61 cw(c1602.74,-78.61) 1602.74,-56.87 C151.1@1610.65,-56.87 ; C150.1@1607.07,200.79 1710.12,200.79 ccw(c1710.12,262.85) LED120.3@1772.18,262.85 ; v1@1963,-306.61 cw(c1963,-305.61) v1(1962,-305.61) 1962,162.39 cw(c2002,162.39) 2002,202.39 J1.5@2078,202.39 ; LED147.3@-1805.06,-32.67 -1815.58,-32.67 ccw(c-1815.58,-57.09) -1840,-57.09 -1840,-203.36 ccw(c-1793.88,-203.36) -1793.88,-249.49 ccw(c-1793.88,-270.61) -1815,-270.61 -1815,-376.36 ccw(c-1728.33,-376.36) LED145.3@-1728.33,-463.03 -1735.42,-463.03 ccw(c-1735.42,-487.61) -1760,-487.61 -1760,-571.61 ccw(c-1662.14,-571.61) LED144.3@-1662.14,-669.47 ccw(c-1662.14,-684.32) -1677,-684.32 -1677,-772.58 ccw(c-1577,-772.58) -1577,-872.58 LED143.3@-1569.97,-872.58 ; LED143.3@-1569.97,-872.58 ccw(c-1569.97,-891.61) -1589,-891.61 -1589,-953.53 ccw(c-1489,-953.53) -1489,-1053.53 LED142.3@-1449.68,-1053.53 -1449.68,-1118.74 ccw(c-1349.68,-1118.74) -1349.68,-1218.74 LED141.3@-1312.11,-1218.74 -1312.11,-1269.33 ccw(c-1212.11,-1269.33) -1212.11,-1369.33 LED140.3@-1150.54,-1369.33 -1150.54,-1396.12 ccw(c-1050.54,-1396.12) -1050.54,-1496.12 LED139.3@-981.95,-1496.12 -981.95,-1502.12 ccw(c-881.95,-1502.12) -881.95,-1602.12 LED138.3@-800.61,-1602.12 ccw(c-717.25,-1602.12) -717.25,-1685.47 LED137.3@-608.72,-1685.47 -608.72,-1743.89 ccw(c-560,-1743.89) -560,-1792.61 -449.81,-1792.61 ccw(c-449.81,-1745.31) LED136.3@-402.51,-1745.31 -402.51,-1794.1 ccw(c-370,-1794.1) -370,-1826.61 -231.73,-1826.61 ccw(c-231.73,-1781.39) LED135.3@-186.51,-1781.39 -186.51,-1793.1 ccw(c-148,-1793.1) -148,-1831.61 -12,-1831.61 ccw(c-12,-1787.61) LED134.3@32,-1787.61 ccw(c80,-1787.61) 80,-1835.61 184.88,-1835.61 ccw(c184.88,-1772.61) 240.53,-1802.14 ; C171.1@-1214.38,-1059.56 -1164,-1059.56 cw(c-1164,-1159.56) -1064,-1159.56 -1064,-1208.28 cw(c-1067.47,-1208.28) C170.1@-1067.47,-1211.75 ; LED52.3@-794.24,-796.04 LED52.3@-790.76,-796.04 -790.76,-869.85 ccw(c-723,-869.85) -723,-937.61 LED51.3@-623.15,-937.61 ; C89.1@-785.08,532.36 -766.31,532.36 ccw(c-766.31,632.36) -666.31,632.36 C90.1@-666.31,670.16 ; C90.1@-666.31,670.16 ccw(c-656.37,681.37) -656.37,666.39 -618.54,666.39 ccw(c-618.54,766.39) -518.54,766.39 -518.54,794.93 ccw(c-504,794.93) -504,780.39 -438.54,780.39 ccw(c-438.54,880.39) -338.54,880.39 C92.1@-338.54,884.93 ; LED51.3@-623.15,-937.61 -623.15,-958.46 ccw(c-535,-958.46) -535,-1046.61 -430,-1046.61 ccw(c-430,-1041.21) LED54.3@-424.6,-1041.21 -424.6,-1071.01 ccw(c-359,-1071.01) -359,-1136.61 -254.93,-1136.61 ccw(c-254.93,-1102.36) LED50.3@-220.68,-1102.36 -220.68,-1119.93 ccw(c-179,-1119.93) -179,-1161.61 -40.71,-1161.61 ccw(c-40.71,-1124.05) LED49.3@-3.15,-1124.05 ccw(c49.41,-1124.05) 49.41,-1176.61 139.08,-1176.61 ccw(c139.08,-1104.42) LED48.3@211.27,-1104.42 211.27,-1119.88 ccw(c237,-1119.88) 237,-1145.61 v2(258,-1145.61) 322.31,-1145.61 ccw(c322.31,-1045.61) 422.31,-1045.61 LED47.3@422.31,-1043.5 ; LED30.3@-605.65,524.04 -625,524.04 ccw(c-625,424.04) -725,424.04 LED29.3@-725,324.7 ccw(c-725,238.7) -811,238.7 -811,107.32 ccw(c-786.75,47.87) -850.95,47.87 -850.95,-59.61 ccw(c-792.81,-59.61) -792.81,-117.76 -806.71,-131.66 ccw(c-806.71,-172.95) -848,-172.95 -848,-241.39 ccw(c-754.36,-241.39) -754.36,-335.03 LED26.3@-719.9,-335.03 ccw(c-719.9,-351.14) -736,-351.14 -736,-423.83 ccw(c-639.94,-423.83) -639.94,-519.89 LED25.3@-594.98,-519.89 ; LED25.3@-594.98,-519.89 -594.98,-566.87 ccw(c-494.98,-566.87) -494.98,-666.87 LED24.3@-428.27,-666.87 LED24.3@-428.27,-677.96 ; -585.72,7.39 -559,7.39 cw(c-559,-30.03) -521.58,-30.03 C33.1@-521.58,-140.87 -446.87,-140.87 ccw(c-446.87,-92.59) -398.59,-92.59 -398.59,-67.19 ccw(c-398.67,6.48) -344.3,-43.24 ; -457.74,-381 cw(c-486.92,-504.09) -360.42,-505 -277.55,-505 cw(c-277.55,-585.94) v2(-223.51,-525.68) ; LED1.3@-371.25,140.71 cw(c-371.25,94.46) -325,94.46 -325,6.48 cw(c-398.67,6.48) -344.3,-43.24 ; LED1.3@-371.25,140.71 -325.04,140.71 ccw(c-325.04,240.71) -225.04,240.71 LED3.3@-225.04,314.35 ; C92.1@-338.54,884.93 ccw(c-314,884.93) -314,860.39 -196,860.39 ccw(c-196,898.39) -158,898.39 cw(c-158,900.7) -160.31,900.7 C93.1@-160.31,936.7 ; v2(-223.51,-525.68) cw(c-277.55,-585.94) C52.1@-196.62,-585.94 -196.62,-573.23 cw(c-164,-573.23) -164,-540.61 C35.1@-156.78,-523.51 -109.67,-464.94 -109.67,-416.52 ccw(c-145.27,-416.52) LED6.3@-145.27,-380.92 cw(c-106.97,-380.92) LED6.3@-143.94,-370.91 ; LED6.3@-143.94,-370.91 cw(c-106.97,-380.92) -106.97,-342.61 -2.17,-342.61 cw(c-2.17,-404.95) LED7.3@60.17,-404.95 ; LED7.3@60.17,-404.95 cw(c144.15,-404.95) 144.15,-320.96 244.35,-320.96 cw(c244.35,-319.61) 243,-319.61 243,-269.36 ; v1@120.5,1550.39 164.36,1550.39 ccw(c164.36,1575.71) 189.68,1575.71 ; 189.68,1575.71 ccw(c212,1575.71) 212,1553.39 346.57,1553.39 ccw(c346.57,1575.87) C140.1@369.05,1575.87 ccw(c422.9,1575.87) 422.9,1522.02 C141.1@556.73,1522.02 ccw(c636.01,1522.02) 636.01,1442.73 729,1442.73 ccw(c829,1442.73) 829,1342.73 C143.1@903.66,1342.73 ; 243,-269.36 cw(c343,-269.36) 343,-169.36 LED10.3@378.25,-169.36 cw(c378.25,-114.85) 323.74,-114.85 323.74,61.55 ; C42.1@368.83,500.28 368.83,473.54 ccw(c468.83,473.54) 468.83,373.54 C43.1@490.39,373.54 ccw(c490.39,361.19) 478.04,361.19 478.04,304.39 ; C162.1@375.03,-1564.64 375.03,-1504.6 cw(c415.02,-1504.6) 415.02,-1464.61 ; C162.1@375.03,-1564.64 C162.1@375.03,-1573.59 cw(c452.01,-1573.59) 452.01,-1496.61 530,-1496.61 cw(c530,-1517.99) 551.38,-1517.99 C161.1@551.38,-1520.61 ; C113.1@407.59,-1213.61 cw(c507.59,-1213.61) 507.59,-1113.61 563.74,-1113.61 cw(c563.74,-1138.5) C112.1@588.63,-1138.5 588.63,-1127.55 cw(c688.63,-1127.55) 688.63,-1027.55 728.11,-1027.55 cw(c728.11,-1043.6) C111.1@742.15,-1035.84 ; LED47.3@422.31,-1043.5 ccw(c440.74,-1043.5) 440.74,-1061.93 516,-1061.93 ccw(c516,-961.93) 616,-961.93 LED46.3@616,-939.61 683.45,-939.61 ccw(c683.45,-839.61) 783.45,-839.61 LED45.3@783.45,-800.93 820.33,-800.93 ccw(c820.33,-700.93) 920.33,-700.93 LED44.3@920.33,-638.14 930.55,-638.14 ccw(c930.55,-538.14) 1030.55,-538.14 LED43.3@1030.55,-447.8 ccw(c1030.55,-350.34) 1128,-350.34 1128,-269.34 ccw(c1097.62,-269.34) LED42.3@1097.62,-238.96 ; 478.04,304.39 478.04,265.39 ccw(c509.04,265.39) 509.04,234.39 C44.1@574,234.39 ccw(c574,208.39) 548,208.39 548,132.89 ; 548,132.89 ccw(c617,132.89) 562.88,90.09 ; C161.1@551.38,-1520.61 cw(c651.38,-1520.61) 651.38,-1420.61 700.02,-1420.61 cw(c700.02,-1443.93) C160.1@723.33,-1443.93 723.33,-1426.61 cw(c823.33,-1426.61) 823.33,-1326.61 891.97,-1326.61 891.97,-1311.64 cw(c991.97,-1311.64) 991.97,-1211.64 1056.18,-1211.64 1056.18,-1170.61 cw(c1156.18,-1170.61) 1156.18,-1070.61 1202.18,-1070.61 cw(c1202.18,-1073.81) C157.1@1205.38,-1073.81 ; v1@695,-484.32 ccw(c755.85,-483.61) 755.85,-544.46 ; C98.1@715.84,1064.26 715.84,1033.83 ccw(c815.84,1033.83) 815.84,933.83 855,933.83 855,928.29 ; C111.1@742.15,-1035.84 742.15,-994.61 cw(c842.15,-994.61) 842.15,-894.61 895.06,-894.61 cw(c895.06,-908.61) C110.1@905,-898.76 ; 855,928.29 855,916.28 ccw(c955,916.28) 955,816.28 974.41,816.28 ; C110.1@905,-898.76 905,-855.51 cw(c987,-855.51) 987,-773.51 1003.52,-773.51 cw(c1003.52,-782.63) 1012.64,-782.63 1012.64,-714.61 cw(c1112.64,-714.61) 1112.64,-614.61 C108.1@1131,-614.61 1131,-500.31 cw(c1188.23,-500.31) 1188.23,-443.07 cw(c1202.93,-405.94) 1163,-405.94 1163,-309.61 cw(c1199.63,-309.61) 1199.63,-272.98 1211.89,-272.98 ; 974.41,816.28 ccw(c980.09,803.39) 966,803.39 966,738.72 ccw(c1066,738.72) 1066,638.72 1110.88,638.72 ccw(c1110.88,615.84) 1088,615.84 1088,563.77 ccw(c1188,563.77) C102.1@1188,463.77 ; LED129.3@1038.13,-1470.17 1108.45,-1470.17 ccw(c1108.45,-1370.17) 1208.45,-1370.17 LED128.3@1208.45,-1321.93 1260.32,-1321.93 ccw(c1260.32,-1221.93) 1360.32,-1221.93 LED127.3@1360.32,-1162.01 1392.7,-1162.01 ccw(c1392.7,-1062.01) 1492.7,-1062.01 LED126.3@1492.7,-990.51 1502,-990.51 ccw(c1502,-890.51) 1602,-890.51 LED125.3@1602,-804.61 1654.39,-804.61 ccw(c1654.39,-720) 1739,-720 1739,-657.47 ccw(c1686.86,-657.47) LED124.3@1686.86,-605.33 1722.28,-605.33 ccw(c1722.28,-534.61) 1793,-534.61 1793,-430.54 ccw(c1749.75,-430.54) LED123.3@1749.75,-387.29 1790.32,-387.29 ccw(c1790.32,-352.61) 1825,-352.61 v1(1825,-305.61) 1825,-212.01 ccw(c1784.42,-212.01) LED122.3@1784.42,-171.44 1813.17,-171.44 ccw(c1813.17,-147.61) 1837,-147.61 1837,5.63 ccw(c1791.22,5.63) LED121.3@1791.22,51.4 1806.01,51.4 ccw(c1806.01,76.39) 1831,76.39 1831,204.04 ccw(c1772.18,204.04) LED120.3@1772.18,262.85 ; C102.1@1188,463.77 1185.24,463.77 ccw(c1185.24,436.53) 1158,436.53 1158,379.02 ccw(c1251.47,379.02) C103.1@1251.47,285.55 1229.2,285.55 ccw(c1229.2,256.35) 1200,256.35 1200,183.23 ccw(c1279.35,183.23) 1263.61,105.46 1261.23,105.46 ccw(c1261.23,66.39) 1222.16,66.39 1222.16,-1.45 ccw(c1279.99,-1.45) C105.1@1279.99,-59.28 ccw(c1279.99,-147.27) 1192,-147.27 1192,-230.27 ccw(c1247.79,-230.27) 1211.89,-272.98
  Bottom Layer w10: C192a.1@-930.83,-154.94 cw(c-921,-154.94) C192a.1@-921,-145.11 ; v2@-898,-145.11 v2(-898,-145) ; Q13a.2@-818.4,-394.34 Q13a.2@-810.66,-394.34 ; C4.1@-540.81,-127.29 ccw(c-539,-127.29) C4.1@-539,-129.1 ; -487,272.39 cw(c-483.18,272.39) -483.18,276.21 C7.2@-459,276.21 ; v1@203,-206.11 207.5,-201.61 v1(212,-201.61) ; 493,-171.61 U3.21@493,-29.1 ; 494,-171.61 502,-179.61 v1@502,-195.61 ; 732.85,-539.61 806.39,-539.61 819,-527 R24.2@819,-511.44
  Bottom Layer w25: P9.1@-1205,189.39 ccw(c-1205,176.39) -1218,176.39 P7.1@-1218,67.39 -1120,67.39 ; v1(-1141.84,1068.65) -1141.84,1031.23 ccw(c-1110,1031.23) v1(-1110,999.39) ; v1(-1120,30.39) -1120,52.39 -1119.94,53.74 cw(c-1105,52.39) -1105,67.39 -954,67.39 cw(c-954,-32.61) -854,-32.61 C22.2@-854,-64.61 C21.2@-894,-64.61 C20.2@-934,-64.61 ; R35a.1@-932.83,-187 -932.83,-174.44 v2@-903.5,-145.11 ; C192a.1@-921,-145.11 v2@-903.5,-145.11 ; v2@-898,-145.11 v2@-903.5,-145.11 ; v1(-828,-759.61) -828,-858.69 ccw(c-791.08,-858.69) -791.08,-895.61 -589,-895.61 ; Q13a.2@-810.66,-394.34 cw(c-810.66,-426) v2(-779,-426) ; R26.2@-580.47,-895.61 -589,-895.61 ; Q10.2@-566.68,-1014.01 -578.6,-1014.01 cw(c-578.6,-978.61) -614,-978.61 -614,-920.61 cw(c-589,-920.61) -589,-895.61 ; C4.1@-540.81,-127.29 C8.2@-540.81,-79.1 ; C2.1@-507.5,364.4 ccw(c-494.49,364.4) -494.49,351.39 C2.1@-493.07,352.81 ; R14.2@-397.5,158.89 -371.11,158.89 v2(-371,159) ; -366,-34.1 -351,-34.1 ccw(c-351,-9.1) -326,-9.1 v2(-326,-7) ; v2(-185,-144.61) -152.5,-144.61 C25.1@-142.5,-154.61 ; v1(-66,1830.39) ccw(c-66,1784.92) -111.46,1784.92 v1(-111.46,1501.39) 124.81,1501.39 cw(c124.81,1456.2) 170,1456.2 ; Q12.2@13.34,-777.33 13.34,-799.34 ccw(c45,-799.34) v2(45,-831) ; v1(41.61,-620.22) 48.41,-627.02 v1(130.16,-627.02) ; Q11.2@69.8,-1044 ccw(c70.32,-998.68) Q11.2@70.32,-1044.01 ; R27.2@79.24,-922.02 106.9,-938.61 ; Q11.2@85.52,-1043.81 ccw(c85.24,-1022.18) 106.88,-1022.18 106.9,-938.61 ; X1.3@113,475.37 cw(c113,515.37) 73,515.37 73,620.39 cw(c96,620.39) 96,643.39 249,643.39 ccw(c249,675.39) v1(281,675.39) ; v1(117.5,1550.39) 147,1550.39 cw(c147,1527.39) 170,1527.39 170,1456.2 ; v1(129,-921.61) 123.9,-921.61 ccw(c123.9,-938.61) 106.9,-938.61 ; v1(170,1116.39) 170,1456.2 ; v2(258,-1145.61) v2(258,-870) ; U5.4@355.82,87.89 cw(c361.32,87.89) 356.56,90.64 v1(390.75,90.64) ; 464,-210.61 487,-210.61 ccw(c487,-195.61) v1@502,-195.61 ; C11.1@640.5,-131.61 ccw(c715,-131.61) 715,-206.11 SW1.2@736.93,-206.11 cw(c775.43,-206.11) 775.43,-167.61 933,-167.61 cw(c933,-203.61) 968.65,-198.61 ; v1(695,-483.61) 695,-502.36 Q8.2@695.6,-502.36 ccw(c732.85,-502.36) 732.85,-539.61 ; v1(856,-355.61) cw(c900,-355.61) 900,-311.61 Q9.2@931,-311.61 ccw(c931,-278.61) 964,-278.61 964,-198.61 ; R25.2@952.83,-198.61 964,-198.61 ; v1(1111.31,-198.61) cw(c1079.25,-198.61) 1079.25,-230.68 996.07,-230.68 cw(c996.07,-203.61) 969,-203.61 ccw(c933,-203.61) 968.65,-198.61 ; v1(1825,-305.61) v1(1962,-305.61) ; 964,-198.61 968.65,-198.61
  other v1: 481,-314.61 -398.59,-104.75 -1220.97,196.42 117,333.39
  other v2: -197,-806
INT: U3.5 U5.3 | length 720.3
  Top Layer w10: v1(215,138.39) 213.19,136.58 213.19,-14.11 v1(237,-37.92)
  Bottom Layer w10: v1(215,138.39) 215.5,137.89 U5.3@355.82,137.89 ; v1@237,-40.84 247.23,-30.61 362,-30.61 cw(c362,-44.61) 376,-44.61 376,-131.61 ccw(c384,-131.61) 384,-139.61 452,-139.61 ; 450,-139.61 ccw(c450,-127.11) 462.5,-127.11 U3.5@462.5,-73.16
LED: Q3.2 R6.2 SB7.1 | length 304.1
  Bottom Layer w10: Q3.2@-176.68,-182.01 -207.6,-182.01 -218,-171.61 -218,-102.61 -171,-55.61 SB7.1@-171,23.39 cw(c-162.17,23.39) -162.17,32.22 R6.2@-132,32.22
LED_A: Q1.2 R2.2 SB9.2 | length 147
  Bottom Layer w10: SB9.2@531,254.89 531,295.22 cw(c557,295.22) Q1.2@557,321.22 ccw(c572.43,321.22) 572.43,305.79 R2.2@614,305.79
LED_B: Q2.2 R4.2 SB10.2 | length 111.3
  Bottom Layer w10: SB10.2@589,254.89 cw(c605.83,254.89) 605.83,271.72 R4.2@630,271.72 638.67,271.72 660,293.05 Q2.2@660,314.87
LED_C: Q4.2 R8.2 SB11.2 | length 271.8
  Bottom Layer w10: SB11.2@596,132.39 ccw(c625,132.39) 600,117.69 ccw(c625,132.39) 625,103.39 674,103.39 Q4.2@723.71,53.68 ; Q4.2@718.6,48.57 719,48.57 719,13.89 ccw(c730.5,13.89) 730.5,2.39 R8.2@784.35,2.39
LED_D: Q5.2 R10.2 SB12.2 | length 293.2
  Top Layer w10: v2(645.89,175.09) 645.89,225.27 v1(666,245.39)
  Bottom Layer w10: v2(645.89,175.09) 657,163.97 SB12.2@657,131.39 ; v1(666,245.39) cw(c679.9,245.39) 679.9,259.29 Q5.2@691.68,259.29 768.31,259.29 ccw(c768.31,275.98) 785,275.98 R10.2@785,305.79
LED_IN: Q3.3 R5.2 SB1.1 | length 586.2
  Top Layer w10: v1(-105,177.39) 22,177.39 33,188.39 SB1.1@33,217.39
  Bottom Layer w10: R5.2@-290.17,-141.61 Q3.3@-262.32,-141.6 ; Q3.3@-261.32,-144.6 -261.32,-91.32 -197,-27 -197,65.39 -106,156.39 -106,176.39 v1(-105,177.39)
LED_IN_A: Q1.3 R1.2 SB2.1 | length 866.4
  Top Layer w10: SB2.1@33,280.39 ccw(c45,280.39) 45,268.39 v1(265,268.39)
  Bottom Layer w10: v1(265,268.39) ccw(c265,273.39) 270,273.39 270,510.39 cw(c290,510.39) 290,530.39 353.41,530.39 cw(c353.41,470.8) 413,470.8 413,370.39 ccw(c436.49,370.39) 436.49,346.9 449.51,346.9 461.23,358.62 Q1.3@472.35,358.62 ccw(c472.35,354.26) 468,354.26 cw(c468,348.26) Q1.3@474,348.26
LED_IN_B: Q2.3 R3.2 SB4.1 | length 736.6
  Top Layer w10: v1(836,316.39) cw(c836,294.39) 858,294.39 858,87.3 868.19,77.11 868.19,-40.81 v1(879,-51.61)
  Bottom Layer w10: R3.2@662.83,423.39 ccw(c686.7,423.39) 686.7,399.51 Q2.3@697.4,399.51 697.4,399.39 ccw(c698.4,399.39) 698.4,398.39 812,398.39 cw(c812,376.39) 834,376.39 834,318.39 ccw(c836,318.39) v1(836,316.39) ; SB4.1@829,-97.61 829,-72.55 cw(c850.94,-72.55) 850.94,-50.61 878,-50.61 cw(c878,-51.61) v1(879,-51.61)
LED_IN_C: Q4.3 R7.2 SB_L2.1 | length 2587.7
  Top Layer w10: v1(898,130.39) 898,121.08 914.81,104.27 914.81,80.58 v1@925.69,69.7
  Bottom Layer w10: Q4.3@756.01,133.22 756.01,133.39 Q4.3@768.65,133.39 ; R7.2@789,156.39 cw(c765.83,156.39) Q4.3@768.65,133.39 ; v1@898,133.39 Q4.3@768.65,133.39 ; v1@925.69,69.7 1189.96,69.7 1223.42,103.15 1430.51,103.15 cw(c1430.51,85.67) 1448,85.67 1448,-770.61 cw(c1348,-770.61) 1348,-870.61 969,-870.61 ccw(c969,-895.61) 944,-895.61 SB_L2.1@944,-1257.61
  other v1: 922.69,69.7
LED_IN_D: Q5.3 R9.2 SB_L4.1 | length 1078.6
  Bottom Layer w10: Q5.3@776.32,222.22 R9.2@825,222.22 849.17,222.22 860.5,210.89 1656.43,210.89 ; 1657.43,210.89 cw(c1657.43,189.32) 1679,189.32 SB_L4.1@1679,40.39 SB_L4.1@1679,29.39
NetC7_1: C7.1 U1.6 | length 42.6
  Bottom Layer w10: C7.1@-459,252.59 -459,220.39 ccw(c-452.38,220.39) U1.6@-452.38,213.77
NetC8_1: C8.1 U2.6 | length 52.3
  Bottom Layer w10: C8.1@-517.19,-79.1 cw(c-512.19,-79.1) -512.19,-74.1 U2.6@-467.74,-74.1
NetD1_1: D1.1 L10.2 LS1.1 | length 788.6
  Bottom Layer w10: D1.1@670.75,-729.2 634.41,-729.2 ccw(c634.41,-751.61) 612,-751.61 612,-837.3 cw(c598.69,-837.3) L10.2@598.69,-850.61 1050,-850.61 ccw(c1050,-827.61) 1073,-827.61 1073,-710.13 ccw(c1069.48,-710.13) LS1.1@1069.48,-706.61
NetD2_1: D2.1 L11.2 LS2.1 | length 324
  Bottom Layer w10: D2.1@1235.41,-81.93 ccw(c1244.48,-81.93) 1244.48,-91.01 L11.2@1285,-91.01 1350.74,-91.01 cw(c1350.74,-104.75) 1364.48,-104.75 LS2.1@1364.48,-286.61
NetD3_1: D3.1 L12.2 LS4.1 | length 469.5
  Bottom Layer w10: L12.2@-285.35,-619 -285.35,-737.69 D3.1@-287.59,-739.93 -287.59,-929.02 ccw(c-264,-929.02) -264,-952.61 LS4.1@-142.52,-952.61
NetD4_1: D4.1 L13.2 LS3.1 | length 334.3
  Bottom Layer w10: D4.1@353.41,-772.93 ccw(c362.48,-772.93) 362.48,-782.01 L13.2@400,-782.01 466.67,-782.01 cw(c466.67,-808.82) 493.48,-808.82 LS3.1@493.48,-982.61
NetD5_1: D5.1 Q12.3 R33.1 | length 229.5
  Bottom Layer w10: D5.1@-70.13,-581.6 -13.17,-638.55 R33.1@-13.17,-656 -13.38,-656 -13.38,-720 cw(c-33.31,-720) -33.31,-739.93 Q12.3@-69.34,-739.93
NetD5a_1: D5a.1 Q13a.3 R34a.1 | length 210.8
  Bottom Layer w10: D5a.1@-871.6,-310.34 -782.32,-310.34 cw(c-782.32,-311.66) Q13a.3@-781,-311.66 -781,-344.17 cw(c-788.83,-344.17) -788.83,-352 R34a.1@-863.5,-352
NetL1_1: L1.1 U1.1 U1.2 | length 170.8
  Bottom Layer w10: L1.1@-711,139.89 ccw(c-706.13,139.89) -706.13,135.03 U1.1@-562.62,135.03 U1.2@-562.62,154.71
NetL2_1: L2.1 U2.1 U2.2 | length 193
  Bottom Layer w10: U2.2@-408.68,-184.34 U2.1@-389,-184.34 -374.66,-184.34 -367,-192 -367,-319.58 L2.1@-381.52,-334.1
NetL3_2: L3.2 U3.4 | length 88.4
  Bottom Layer w10: L3.2@477.83,-161.61 U3.4@477.83,-73.16
NetL4_1: L4.1 SB13.2 | length 45.1
  Bottom Layer w10: SB13.2@152,-142.61 152,-116.35 L4.1@165.35,-103
NetL5_1: L5.1 SB14.2 | length 47.7
  Bottom Layer w10: SB14.2@174,-348.73 183,-339.73 L5.1@218,-339.73
NetL8_2: L8.2 U5.8 | length 53.9
  Bottom Layer w10: L8.2@120.83,275.57 126.82,275.57 cw(c126.82,260.39) 142,260.39 142,240.6 cw(c139.28,240.6) U5.8@139.28,237.89
NetL9_2: L9.2 U6.5 | length 45.7
  Bottom Layer w10: L9.2@344.91,-329.61 ccw(c353.58,-329.61) 353.58,-338.28 U6.5@385.61,-338.28
NetQ8_3: Q8.3 R28.2 | length 140.5
  Bottom Layer w10: R28.2@653,-489.78 653,-444.61 cw(c677,-444.61) 677,-420.61 730.11,-420.61 ccw(c730.11,-417.72) Q8.3@733.01,-417.72
NetQ9_3: Q9.3 R29.2 | length 301
  Bottom Layer w10: Q9.3@846.35,-275.6 Q9.3@853.68,-275.6 ; Q9.3@846.35,-274.21 824.4,-274.21 ccw(c824.4,-283.61) 815,-283.61 815,-386.61 ccw(c828,-386.61) 828,-399.61 906,-399.61 ccw(c906,-381.61) 924,-381.61 924,-357.78 cw(c926.17,-357.78) R29.2@926.17,-355.61
NetQ10_3: Q10.3 R30.2 | length 129.4
  Bottom Layer w10: Q10.3@-651.32,-976.6 -651.32,-1002.49 ccw(c-596.2,-1002.49) -596.2,-1057.61 R30.2@-579.26,-1057.61
NetQ11_3: Q11.3 R31.2 | length 146.2
  Bottom Layer w10: Q11.3@-15.32,-1006.6 -15.32,-1072.82 ccw(c-1.53,-1072.82) -1.53,-1086.61 R31.2@56.74,-1086.61
NetQ12_1: Q12.1 R32.1 | length 113.9
  Bottom Layer w10: Q12.1@13.34,-702.53 36.45,-702.53 cw(c36.45,-712) 45.92,-712 R32.1@45.92,-787.93
NetQ13a_1: Q13a.1 R33a.1 | length 96.1
  Bottom Layer w10: Q13a.1@-743.6,-394.34 -707.92,-394.34 ccw(c-707.92,-387.42) -701,-387.42 R33a.1@-701,-337.83
NetR13_1: R13.1 R14.1 U1.7 | length 101.3
  Bottom Layer w10: U1.7@-452.38,194.08 -399.31,194.08 ccw(c-399.31,195.89) R14.1@-397.5,195.89 -397.5,233.4 ccw(c-402.5,233.4) R13.1@-402.5,238.4